# Altium PCB 2026.11.05.HMS.PD.CNHH.V5.1.PcbDoc (part 2 of 4)
Units mm, origin at the board's own origin, x right, y up, seen from the top; angles counter-clockwise.
Board outline 110 x 110 mm, 2 copper layers (Top Layer, Bottom Layer); 170 components, 117 nets, 610 pads, 1348 vias.
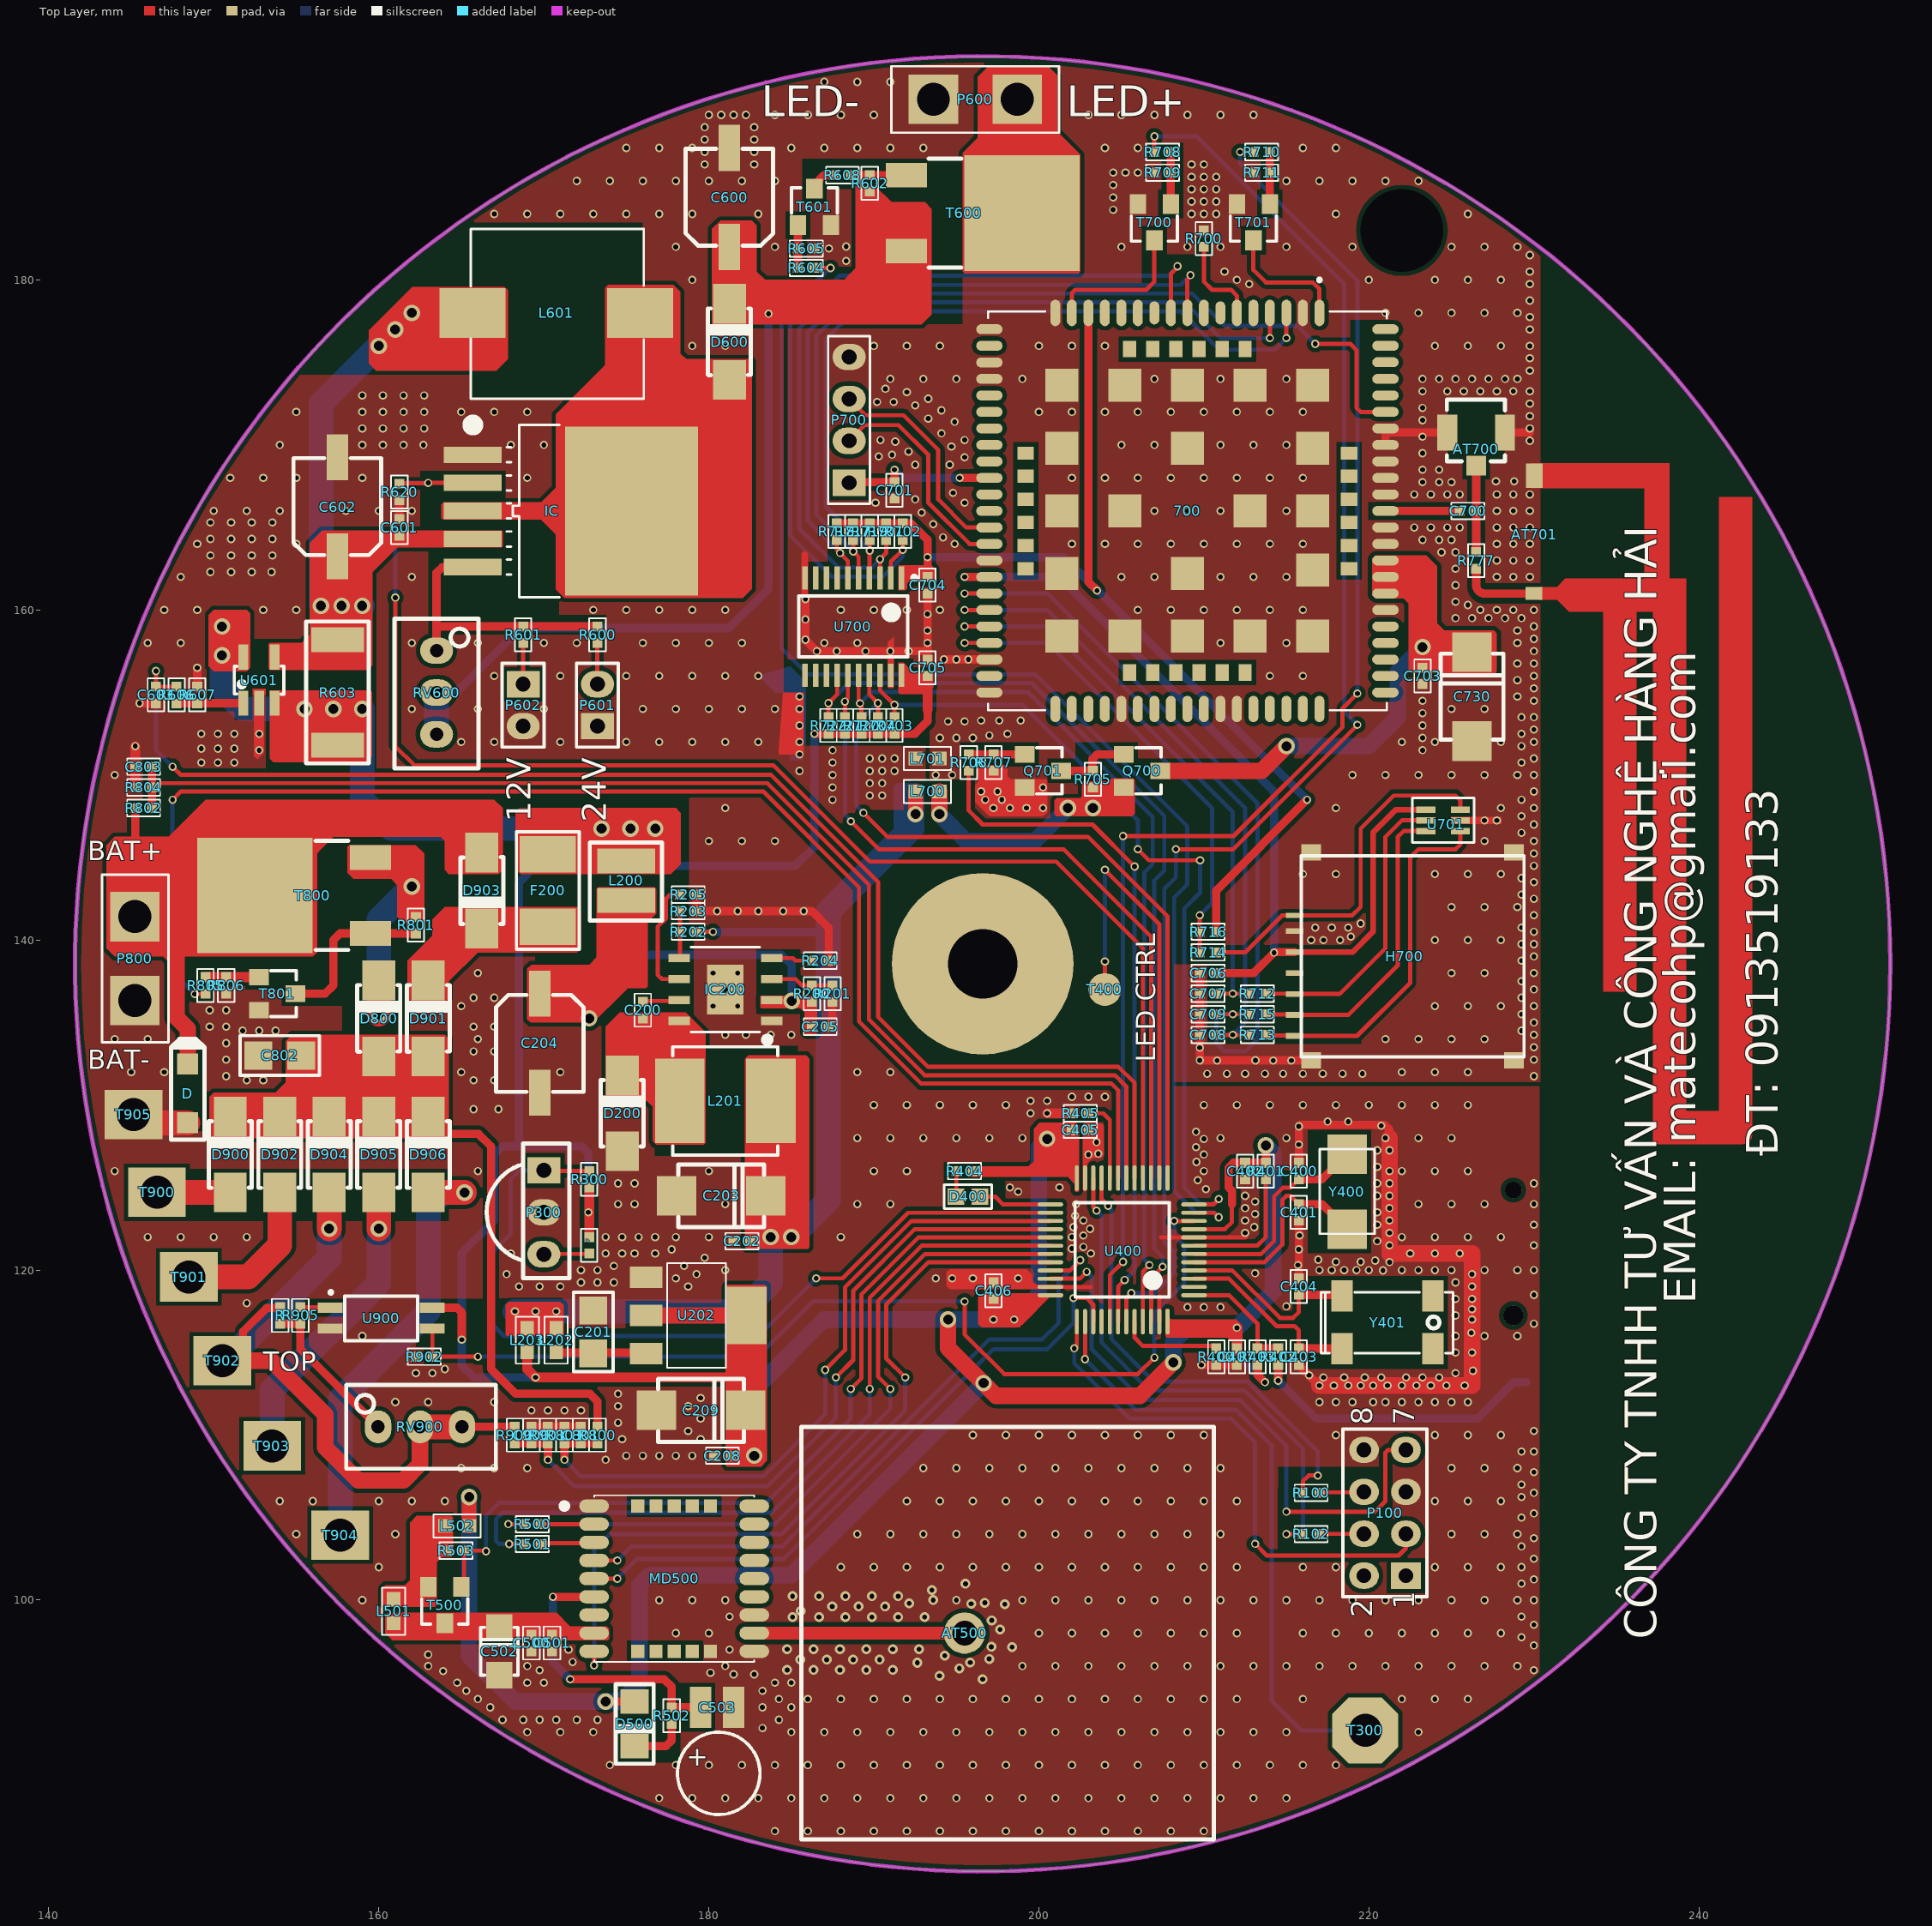
[diagram p0: Top Layer view]

## Part data (continued)
R620: library part Res1, "RES 100K OHM 5% 1/8W 0402", MPN=RC0402JR-07100KL, LatestRevisionDate=17-Jul-2002, LatestRevisionNote="Re-released for DXP Platform.", PackageReference=AXIAL-0.3, Published=8-Jun-2000, Publisher="Altium Limited"
R700: library part RT0603BRD071KL, MFR=YAGEO, MPN=RC0402FR-131KL, Category="Chip Resistor - Surface Mount"
R701 R702 R703 R704 R717 R718 R719 R720 R721 R722: library part RC0402JR-072K2L, "RES 2.2K OHM 1/8W 0402", MFR=YAGEO, Category="Chip Resistor - Surface Mount", MPN=RC0402JR-072K2L
R706 R710: library part Res1, "RES 1K OHM 1% 1/8W 0402", MFR=YAGEO, MPN=RC0402FR-071KL, Category="Chip Resistor - Surface Mount", LatestRevisionDate=17-Jul-2002, LatestRevisionNote="Re-released for DXP Platform.", PackageDescription="Axial Device, Thru-Hole; 2 Leads; 0.3 in Pin Spacing", PackageReference=AXIAL-0.3, Published=8-Jun-2000, Publisher="Altium Limited"
R708: library part Res1, "Trở 1K 1/8W 1% 0603", MFR=YAGEO, MPN=RC0402FR-071KL, Category="Chip Resistor - Surface Mount", LatestRevisionDate=17-Jul-2002, LatestRevisionNote="Re-released for DXP Platform.", PackageDescription="Axial Device, Thru-Hole; 2 Leads; 0.3 in Pin Spacing", PackageReference=AXIAL-0.3, Published=8-Jun-2000, Publisher="Altium Limited"
R709: library part Res1, "RES 4.7K 1% 1/8W 0402", MFR=YAGEO, MPN=RC0603JR-074K7L, Category="Chip Resistor - Surface Mount", LatestRevisionDate=17-Jul-2002, LatestRevisionNote="Re-released for DXP Platform.", PackageDescription="Axial Device, Thru-Hole; 2 Leads; 0.3 in Pin Spacing", PackageReference=AXIAL-0.3, Published=8-Jun-2000, Publisher="Altium Limited"
R711: library part Res1, "RES 4.7K 1% 1/8W 0402", MFR=YAGEO, MPN=RC0402FR-074K7L, Category="Chip Resistor - Surface Mount", LatestRevisionDate=17-Jul-2002, LatestRevisionNote="Re-released for DXP Platform.", PackageDescription="Axial Device, Thru-Hole; 2 Leads; 0.3 in Pin Spacing", PackageReference=AXIAL-0.3, Published=8-Jun-2000, Publisher="Altium Limited"
R712 R713 R714 R715: library part RC0402FR-070RL, "RES 0 OHM JUMPER 1/16W 0402", MFR=YAGEO, Category="Chip Resistor - Surface Mount", MPN=RC0402FR-070RL
R716: library part RC0402JR-074K7P, "RES SMD 4.7K OHM 5% 1/16W 0402", MFR=YAGEO, Category="Chip Resistor - Surface Mount", MPN=RC0402JR-074K7P
R777: library part Res1, "Trở 10K 1/8W 1% 0603", MFR=YAGEO, MPN=RT0603DRD0710KL, Category="Chip Resistor - Surface Mount", LatestRevisionDate=17-Jul-2002, LatestRevisionNote="Re-released for DXP Platform.", PackageDescription="Axial Device, Thru-Hole; 2 Leads; 0.3 in Pin Spacing", PackageReference=AXIAL-0.3, Published=8-Jun-2000, Publisher="Altium Limited", Value1=NC
R800 R802 R900: library part Res1, "Resistor 100K 1/8W 1% 0402", MPN=RC0402JR-07100KL, LatestRevisionDate=17-Jul-2002, LatestRevisionNote="Re-released for DXP Platform.", PackageReference=AXIAL-0.3, Published=8-Jun-2000, Publisher="Altium Limited"
R801: library part Res1, "RES 10K OHM 5% 1/8W 0402", LatestRevisionDate=17-Jul-2002, LatestRevisionNote="Re-released for DXP Platform.", PackageReference=AXIAL-0.3, Parameter 1=RC0402JR-0710KL, Published=8-Jun-2000, Publisher="Altium Limited"
R805: library part Res1, "Resistor 1K 1/8W 1% 0603", MPN=RC0402FR-071KL, LatestRevisionDate=17-Jul-2002, LatestRevisionNote="Re-released for DXP Platform.", PackageReference=AXIAL-0.3, Published=8-Jun-2000, Publisher="Altium Limited"
R902 R905: library part Res1, "RES 10K OHM 5% 1/8W 0402", MFR=YAGEO, MPN=RC0402JR-0710KL, Category="Chip Resistor - Surface Mount", LatestRevisionDate=17-Jul-2002, LatestRevisionNote="Re-released for DXP Platform.", PackageDescription="Axial Device, Thru-Hole; 2 Leads; 0.3 in Pin Spacing", PackageReference=AXIAL-0.3, Published=8-Jun-2000, Publisher="Altium Limited"
RV600: library part Res_Vol_Single, "Volume Varistor Single 200K", MPN=3296W-204, LatestRevisionDate=17-Jul-2002, LatestRevisionNote="Re-released for DXP Platform.", PackageReference=3296W-204, Published=8-Jun-2000, Publisher="Altium Limited", Set Position=0.5, Sim Note="Enter the Resistance value and the set point into parameter fields."
RV900: library part Res_Vol_Single, "Volume Varistor Single 100K", MPN=3296W-104, LatestRevisionDate=17-Jul-2002, LatestRevisionNote="Re-released for DXP Platform.", PackageReference=VR5, Published=8-Jun-2000, Publisher="Altium Limited", Set Position=0.5, Sim Note="Enter the Resistance value and the set point into parameter fields."
T500: library part A03415, "Mosfet P Channel", Category="Transistor PNP", MPN=AO3415
T600 T800: library part AOD4185, "MOSFET P-CH 60V 26A TO252", Current - Continuous Drain (Id) @ 25° C="3.7A (Ta)", Drain to Source Voltage (Vdss)=20V, Input Capacitance (Ciss) @ Vds="633pF @ 10V", Manufacturer="International Rectifier", Package / Case="TO-236-3, SC-59, SOT-23-3", Power - Max=1.3W, Supplier Device Package=Micro3™/SOT-23, Supplier Part Number 1=IRLML6402GTRPBFDKR-ND, Category="Discrete Semiconductor Products", ComponentLink1Description=http://www.irf.com/product-info/datasheets/data/irlml6402gpbf.pdf, ComponentLink1URL=http://www.irf.com/product-info/datasheets/data/irlml6402gpbf.pdf, FET Feature="Logic Level Gate", FET Type="MOSFET P-Channel, Metal Oxide", Gate Charge (Qg) @ Vgs="12nC @ 5V", Mounting Type="Surface Mount", MPN=AOD409, Packaging=Digi-Reel®, Pricing 1="1=0.6, 10=0.34, 25=0.2932, 50=0.2468, 100=0.2209, 250=0.20072, 500=0.18058, 1000=0.16904 (USD)", Rds On (Max) @ Id, Vgs="65 mOhm @ 3.7A, 4.5V", RoHS="RoHS Compliant", Stock 1=4068, Supplier 1=Digi-Key, Vgs(th) (Max) @ Id="1.2V @ 250µA"
T601: library part 2SC1815-HF, "Trans C1815 NPN 0.15A/50V SMD SOT23", MPN=2SC1815
T700: library part 2SC1815-HF, "Trans C1815 NPN 0.15A/50V SMD SOT23", MFR=LinhKienChatLuong, MPN=2SC1815, Parameter 2="Transistor NPN"
T701: library part 2SC1815-HF, "Trans C1815 NPN 0.15A/50V SMD SOT23", MFR=LinhKienChatLuong, Category="Transistor NPN", MPN=2SC1815
T801: library part 2SC1815-HF, "Transistor  50V 150mA  NPN SMD SOT-23", MPN=2SC1815
U202: "800mA and 1A Low Dropout Positive Regulator 3.3V", MPN=TLV1117LV33DCYR
U400: "STM32L ARM-based EnergyLite 32-bit MCU, 128 kB Flash, 16 kB Internal RAM, -40 to +85°C Temperature, 32-pin LQFP, Tray", ComponentLink1Description="Manufacturer URL", ComponentLink1URL=http://www.st.com/, ComponentLink2Description="STM32L151/152 Datasheet", ComponentLink2URL=http://www.st.com/internet/com/TECHNICAL_RESOURCES/TECHNICAL_LITERATURE/DATASHEET/CD00277537.pdf, ComponentLink3Description="STM32 L1 Family Web Page", ComponentLink3URL=http://www.st.com/internet/mcu/subclass/1376.jsp, DatasheetVersion="rev6, Jan-2012", MPN=STM32L151CBT6, PackageDescription="48-Pin Low-Profile Quad Flat Pack, 7 x 7 mm Body, 0.5 mm Pitch (LQFP48)", PackageReference=LQFP48, PackageVersion="rev13, Apr-2011"
U601: library part INA138, "IC Current Monitor Regulator 0.5% SOT-23-5", MPN=INA138NA/3K
U700: library part TC7MPB9307FK, "IC Logic Convert 1.8V 3.3V 20-VSSOP", Manufacturer="Texas Instruments", Operating Temperature="-40°C ~ 85°C", Package / Case="20-TSSOP (0.173\", 4.40mm Width)", Supplier Device Package=20-TSSOP, Supplier Part Number 1=296-21527-2-ND, Voltage - Supply="1.2 V ~ 3.6 V, 1.65 V ~ 5.5 V", Category="Integrated Circuits (ICs)", ComponentLink1Description=http://www.ti.com/lit/ds/symlink/txb0108.pdf, ComponentLink1URL=http://www.ti.com/lit/ds/symlink/txb0108.pdf, Data Rate=100Mbps, Differential - Input:Output=No/No, Input Type=Logic, Logic Function="Translator, Bidirectional", Mounting Type="Surface Mount", MPN=TC7MPB9307FT(EL), Number of Bits=8, Number of Channels=8, Number of Outputs/Channel=1, Output Type=Logic, Packaging="Tape & Reel (TR)", Pricing 1="2000=0.9 (USD)", Propagation Delay (Max)=4ns, RoHS="RoHS Compliant", Stock 1=18000, Supplier 1=Digi-Key
U701: library part SMF05C, "TVS Diode Array For ESD and Latch-Up Protection", Breakdown Voltage Max=7.2, Breakdown Voltage Min=6.2, Clamping Voltage Vc Max=21.5, Manufacturer="ON SEMICONDUCTOR", Peak Pulse Current Ippm=8, Reverse Stand-Off Voltage Vrwm=13, Supplier Part Number 1=45J2265, ComponentLink1Description=http://www.onsemi.com/pub/Collateral/SMF05C-D.PDF, ComponentLink1URL=http://www.onsemi.com/pub/Collateral/SMF05C-D.PDF, MPN=SMF05CT2G, No. of Pins=6, Pricing 1="6000=0.102, 15000=0.093, 30000=0.087, 75000=0.078, 150000=0.075 (USD)", RoHS=YES, Stock 1=0, Supplier 1=Newark, TVS Polarity=Unidirectional
U900: library part OPTOISO1, "Optoisolator Transistor Output 3750Vrms 1 Channel 4-SOP", MFR="Vishay Semiconductor Opto Division", Category="Optoisolators - Transistor, Photovoltaic Output", Component Type=IC, MPN=EL3H7(C)(TA)-G
Y400: library part XTAL, "Crystal 8Mhz 20pF SMD 5032", MPN=ABM3-8.000MHz-12-D4Y-T, LatestRevisionDate=17-Jul-2002, LatestRevisionNote="Re-released for DXP Platform.", PackageDescription="Crystal, Thru-Hole; 2 Leads; Body 3.1 x 8.2 mm (Dia.xH)", PackageReference=R38, Published=8-Jun-2000, Publisher="Altium Limited"
Y401: library part ABS25-32768-6-T, "CRYSTAL 32.768KHZ 6PF SMD", ESR (Equivalent Series Resistance)="50 kOhm", Frequency=32.768kHz, Frequency Stability=-, Frequency Tolerance=±20ppm, Load Capacitance=6pF, Manufacturer="Abracon Corporation", Manufacturer Part Number=ABS25-32.768KHZ-6-T, Operating Mode=Fundamental, Operating Temperature="-40°C ~ 85°C", Package / Case="4-SOJ, 5.50mm pitch", Supplier Part Number 1=535-10240-2-ND, Category="Crystals and Oscillators", ComponentLink1Description=http://www.abracon.com/Resonators/abs25.pdf, ComponentLink1URL=http://www.abracon.com/Resonators/abs25.pdf, Height="0.098\" (2.50mm)", Mounting Type="Surface Mount", MPN=ABS25-32768-6-T, Packaging="Tape & Reel (TR)", Pricing 1="3000=0.285, 6000=0.2755, 15000=0.266 (USD)", Ratings=-, RoHS="RoHS Compliant", Size / Dimension="0.315\" L x 0.150\" W (8.00mm x 3.80mm)", Stock 1=51000, Supplier 1=Digi-Key, Type="kHz Crystal (Tuning Fork)"
R205: Category=0402, MPN=NC

## Free pads (board coordinates)
  round 11 hole 4.2: 0(196.596,138.557)
  round 0 hole 5: 0(222,183)

## Via types
v1: diameter 0.5, hole 0.3, Top Layer to Bottom Layer, tented both sides, 1263 vias
v2: diameter 0.6, hole 0.3, Top Layer to Bottom Layer, tented both sides, 48 vias
v3: diameter 1, hole 0.6, Top Layer to Bottom Layer, tented both sides, 37 vias

## Nets (pads, with @x,y where several pads share a name; then routed paths per layer and width w, separated by ;. In a path a pad name is that pad's centre, name@x,y a point inside that pad or via, vN(x,y) a via of type N, cw(c..) or ccw(c..) an arc to the next point about the centre after c; other vN are vias at no path point)
1.8V: 700.15 C704.2 R701.2 R702.2 R716.2 R717.2 R718.2 R719.2 U700.1 | length 64.7
  Top Layer w0.5: R718.2@187.75,165.25 R717.2@188.75,165.25 R719.2@189.75,165.25 R701.2@190.75,165.25 R702.2@191.75,165.25 ; R702.2@191.8,165.2 R702.2@191.75,165.25 ; C704.2@193.25,162 193.25,164.25 192.25,165.25 R702.2@191.75,165.25 ; 700.15@203.019,178.019 700.15@203,178 203,161.7 v1(203.525,161.175) ; R716.2@210.75,140.5 210.75,143 v1(216.25,148.5)
  Bottom Layer w0.5: v1(193.25,163.2) 201.525,163.2 v1@203.537,161.187 ; v1(203.525,161.175) 203.575,161.175 v1(216.25,148.5)
3.3V: `.1 C208.2 C209.1 C402.2 C405.2 C406.2 C407.2 C705.2 D500.1 L203.2 L502.1 R300.2 R401.2 R403.1 R404.1 R703.2 R704.2 R720.2 R721.2 R722.2 U202.2 U400.9 U400.24 U400.36 U400.48 U700.20 U900.4 | length 253
  Top Layer w0.254: U400.9@209.4,122.475 211.275,122.475 211.7,122.9 211.7,124
  Top Layer w0.5: U900.4@163.246,117.718 164.739,117.718 165.032,117.425 v1(165.032,115.782) ; v3(173.75,93.85) D500.1@175.5,93.85 ; v1(186.4,152.5) R722.2@187.25,152.5 R721.2@188.25,152.5 R720.2@189.25,152.5 R704.2@190.25,152.5 192.5,152.5 193.25,153.25 193.25,153.95 ; 211.7,124 211.7,124.8 211.5,125 211.5,126.207 211.793,126.5 C402.2@212.5,126.5 R401.2@213.75,126.5 v3(213.75,127.55) ; C407.2@212,115.25 v1(212,116.5) ; R403.1@213.25,114.25 213.25,113.65 v1(213.7,113.2)
  Top Layer w0.6: L203.2@169,115.027 169,114 v1(169.5,113.5) 183,113.5 ; `.1@172.75,122 R300.2@172.75,125 ; 193.25,153.95 C705.2@193.25,156 ; R404.1@196,126 200.5,126
  Top Layer w0.9: L502.1@165.475,104.5 v3(165.475,106.25)
  Top Layer w1: U202.2@176.202,117.25 179,117.25 U202.2@182.298,117.25 ; v3(194.5,117) 194.5,115.275 197.4,112.375 206.125,112.375 v3(208.15,114.4)
  Bottom Layer w0.5: v1(169.5,113.5) 165.75,113.5 165.032,114.218 v1(165.032,115.782) 165.032,121.032 167,123 167,127 167.5,127.5 168.5,127.5 ; v1(172.7,123.5) 172.7,127.1 172.3,127.5 168.5,127.5 ; v1(186.4,152.5) 186.4,145.65 185.25,144.5 169.5,144.5 168.5,143.5 168.5,127.5 ; v1(212,116.5) 212,114.9 v1(213.7,113.2)
  Bottom Layer w0.6: v3@200.5,127.899 v3(200.5,127.95)
  Bottom Layer w1: v3(165.475,106.25) 165.475,96.625 168.25,93.85 v3(173.75,93.85) 174.65,93.85 175.8,95 175.8,100.914 176.386,101.5 185,101.5 v3(196.65,113.15) ; v3(182.75,108.75) 182.75,112.75 187,117 v3(194.5,117) v1(197.25,117) v1(198.5,117) 200,118.5 200,127.45 v3(200.5,127.95) ; v3(208.15,114.4) 208.15,115.65 209,116.5 v1(212,116.5) 214.2,118.7 214.2,127.1 v3(213.75,127.55)